# Altium PCB PCB.PcbDoc
Units mm, origin at the board's own origin, x right, y up, seen from the top; angles counter-clockwise.
Board outline 31.75 x 20.95 mm, 2 copper layers (Top Layer, Bottom Layer); 69 components, 37 nets, 155 pads, 28 vias.
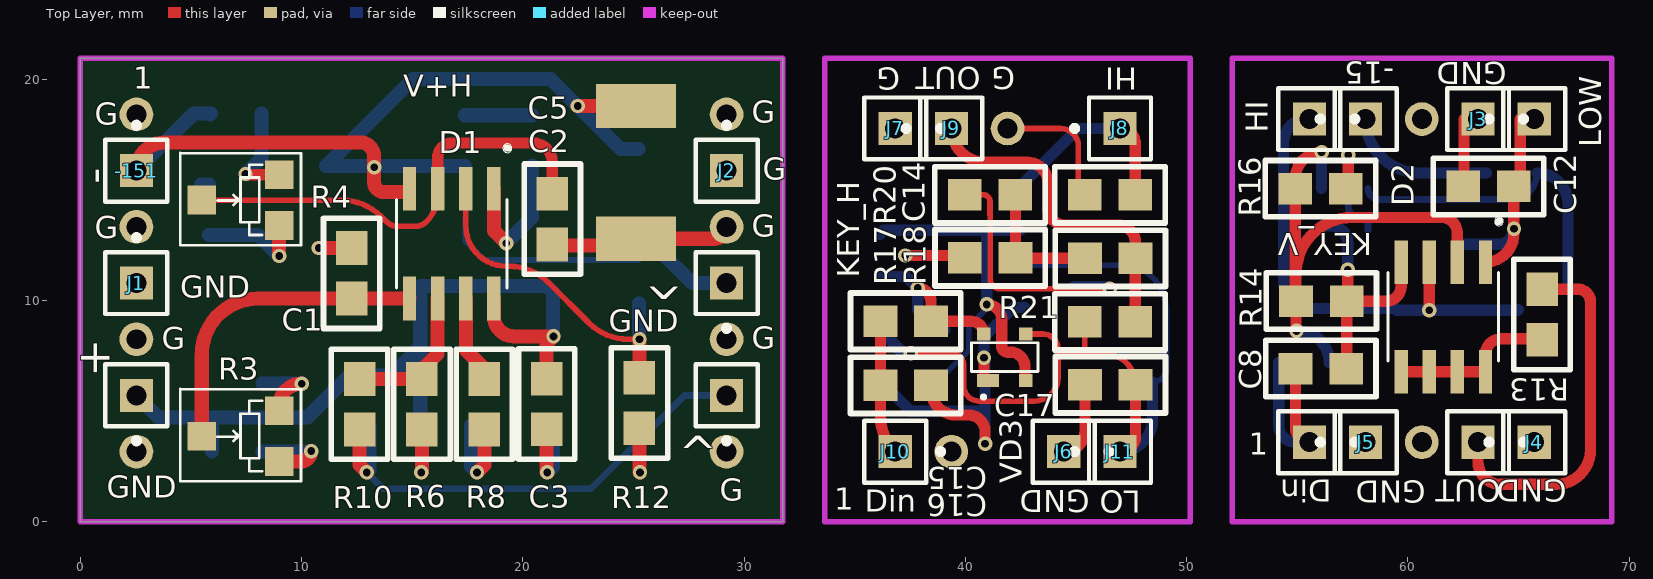
[diagram p0: Top Layer view]
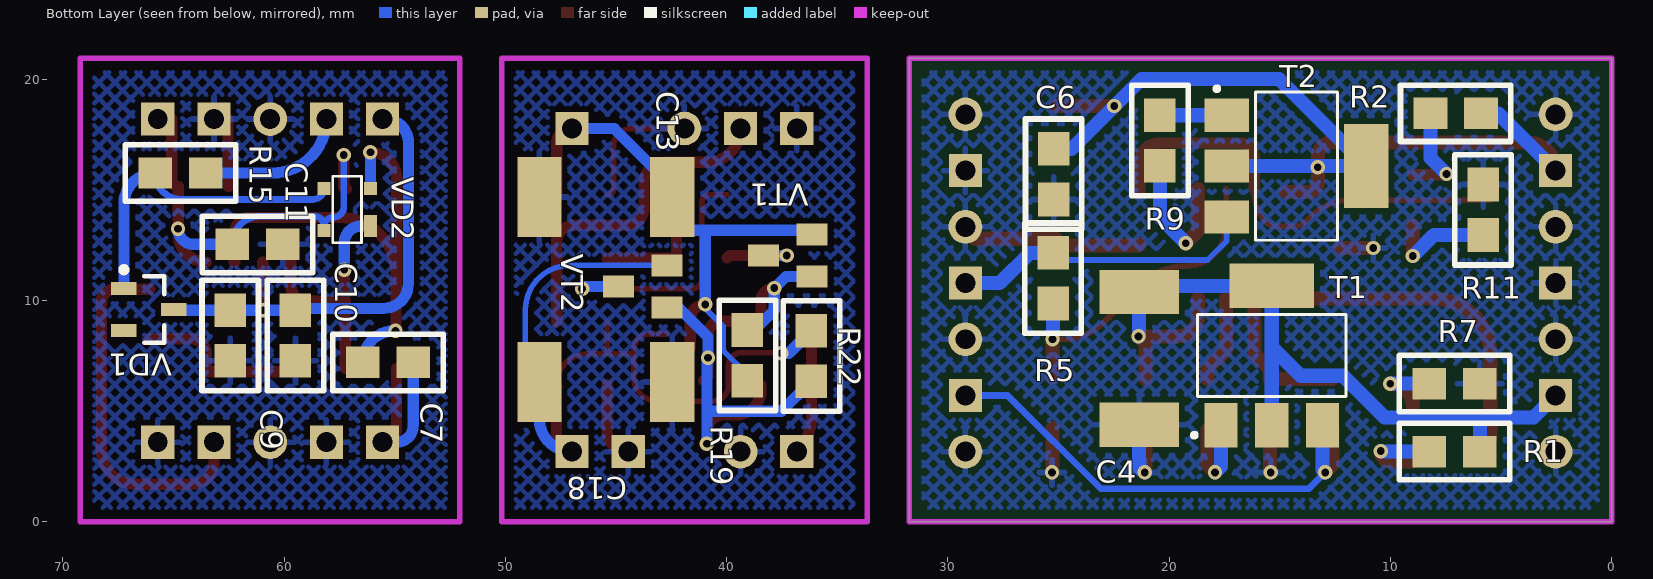
[diagram p1: Bottom Layer view, seen from below]

## Layer stack, top to bottom
Top Solder: solder mask 0.0102, Solder Resist, Dk 3.5
Top Layer: signal copper 0.0356
Dielectric 1: dielectric 0.32, FR-4, Dk 4.8
Bottom Layer: signal copper 0.0356
Bottom Solder: solder mask 0.0102, Solder Resist, Dk 3.5

## Board outline
0,0 0,20.955 31.75,20.955 31.75,0

## Design rules (kind name [scope] priority, off if disabled: settings)
Clearance [All] p1: gap=0.254
PolygonConnect [All] p1: connectstyle=Relief reliefconductorwidth=0.254 reliefentries=4 polygonreliefangle="90 Angle" airgapwidth=0.254
RoutingVias [All] p1: holewidth=0.711 width=1.27 viastyle="Through Hole" minholewidth=0.711 minwidth=1.27 maxholewidth=0.711 maxwidth=1.27
SolderMaskExpansion [All] p1: expansion=0.102
Width [All] p1: maxlimit=1 minlimit=0.127 preferedwidth=0.254
29 further rules are at their usual default settings.

## Classes and differential pairs
component class Sheet1: + -151 ^ C1 C2 C3 C4 C5 C6 D1 J1 J2 R2 R3 R4 R5 R6 R7 R8 R9 R10 R11 R12 T1 T2
component class Sheet2: C13 C14 C15 C16 C17 C18 J6 J7 J8 J9 J10 J11 R17 R18 R19 R21 R22 VD3 VT1 VT2

## Components (designator, comment, footprint, x,y, rotation, side; value= is the part's Value field where it differs from the comment)
+ "" PIN1 2.54,5.715 r180 top (schematic designator +15)
-15 "" PIN1 58.091,18.207 r90 top
-151 "-" PIN1 2.54,15.875 r0 top
^ "" PIN1 29.21,5.715 r180 top (schematic designator V_HIGH1)
^ "" PIN1 29.21,10.795 r180 top (schematic designator V_LOW1)
C1 "0.1" CAP_SMALL 10.998,13.741 r270 top
C2 "0.1" CAP_SMALL 22.606,11.176 r90 top
C3 "0.1" CAP_SMALL 22.352,2.819 r90 top
C4 "22" Cap_BIG 19.456,11.481 r0 bottom
C5 "22" Cap_BIG 27.026,19.888 r180 top
C6 "0.1" CAP_SMALL 23.952,13.208 r90 bottom
C7 "0.1" CAP_SMALL 57.811,5.938 r180 bottom
C8 "0.1" CAP_SMALL 58.573,8.199 r180 top
C9 "4.7" CAP_SMALL 61.164,5.913 r90 bottom
C10 "0.1" CAP_SMALL 58.218,5.913 r90 bottom
C11 "4.7" CAP_SMALL 58.7,13.812 r0 bottom
C12 "0.1" CAP_SMALL 61.139,13.889 r0 top
C13 "22,0" Cap_BIG 49.555,16.586 r270 bottom
C14 "0,1" CAP_SMALL 49.047,16.053 r180 top
C15 "100" CAP_SMALL 34.798,7.798 r0 top
C16 "100" CAP_SMALL 34.798,4.902 r0 top
C17 "0,1" CAP_SMALL 44.044,4.928 r0 top
C18 "22,0" Cap_BIG 49.555,8.23 r270 bottom
D1 "LF353" SOIC127P600X175-8N 16.789,12.573 r270 top
D2 "IRF7309" SOIC127P600X175-8N 61.601,9.266 r270 top
Din "" PIN1 55.551,3.602 r270 top
HI "" PIN1 55.551,18.207 r270 top (schematic designator V_HIGH)
J1 "GND" PIN1 2.54,10.795 r0 top
J2 "GND" PIN1 29.21,15.875 r0 top
J3 "GND1" PIN1 63.171,18.207 r270 top
J4 "GND1" PIN1 65.711,3.602 r90 top
J5 "GND1" PIN1 58.091,3.602 r90 top
J6 "GND" PIN1 44.45,3.175 r270 top
J7 "G" PIN1 36.83,17.78 r270 top
J8 "HI" PIN1 46.99,17.78 r90 top
J9 "OUT" PIN1 39.37,17.78 r90 top
J10 "Din" PIN1 36.83,3.175 r270 top
J11 "LO" PIN1 46.99,3.175 r90 top
LOW "" PIN1 65.711,18.207 r90 top (schematic designator V_LOW)
OUT "" PIN1 63.171,3.602 r270 top
R1 "10k" RES 4.623,1.93 r90 bottom
R2 "10k" RES 4.572,17.221 r90 bottom
R3 "10k" PODSR_RES 7.163,3.861 r90 top
R4 "10k" PODSR_RES 7.163,14.529 r90 top
R5 "249" RES 26.492,8.534 r180 bottom
R6 "1k" RES 14.199,2.834 r0 top
R7 "10k" RES 4.623,5.004 r90 bottom
R8 "100" RES 19.507,7.798 r180 top
R9 "100" RES 21.666,14.757 r180 bottom
R10 "249" RES 13.868,7.798 r180 top
R11 "10k" RES 4.572,16.586 r0 bottom
R12 "1k" RES 24.028,2.896 r0 top
R13 "3" RES 67.311,11.857 r180 top
R14 "100k" RES 58.573,8.732 r90 top
R15 "10k" RES 62.205,14.524 r90 bottom
R16 "10k" RES 53.569,16.302 r270 top
R17 "3" RES 38.641,13.183 r270 top
R18 "3" RES 44.069,13.157 r270 top
R19 "2,21" RES 37.821,10.008 r0 bottom
R20 "3" RES 38.633,16.027 r270 top
R21 "100k" RES 44.058,10.287 r270 top
R22 "2,21" RES 34.925,9.982 r0 bottom
T1 "PZT2222" SOT230P700X180-4N 15.367,7.518 r180 bottom
T2 "PZT2907" SOT230P700X180-4N 14.249,16.078 r270 bottom
VD1 "MMBZ5229" SOT-23_N 66.117,9.596 r180 bottom
VD2 "HSMS2805" SOT-143B 57.151,14.117 r90 bottom
VD3 "HSMS2805" SOT-143B 41.783,7.442 r0 top
VT1 "MMBT3640" SOT23-BEC_MMBT3640*(Primary) 37.236,12.04 r90 bottom
VT2 "MMBT2369" SOT23-BEC_MMBT3640*(Primary) 43.79,10.643 r90 bottom

## Footprints (in the part's own frame and the unit in brackets; to place one, negate y for a bottom-side part, rotate by r counter-clockwise, add the part's x,y. Pads: shape width x height; smd on the part's side, far side on the other; paste and mask are expansions set on the pad)
Cap_BIG [mm] "FROM_MAX"
  rect 3.6x2 smd: 1(1.905,7.092) 2(1.905,1.092)
  body extent 0,-0.01 3.81,8.19, height 2.54
CAP_SMALL [mil] "FROM_MAX"
  rect 60x55.98 smd: 1(53.71,50) 2(143.71,50)
  silkscreen extent 1,0 197,100, body extent 20,18 178,82, height 100
PIN1 [mm] "Connector; Plug"
  rect 1.5x1.5 hole 0.9: 1(0,0)
  silkscreen extent -1.4,-1.4 1.4,2.17
PODSR_RES [mm] "PODSR_RES"
  rect 1.3x1.3 smd: 1(-1.136,-1.83) 2(0.014,1.67) 3(1.164,-1.83)
  silkscreen extent -2.03,-2.82 2.14,2.64
RES [mil] "FROM_MAX"
  rect 55.98x60 smd: 1(49,52.71) 2(49,142.71)
  silkscreen extent -1,0 99,196, body extent 17,19 81,177, height 100
SOIC127P600X175-8N [mm]
  rect 1.97x0.6 smd: 1(-2.475,1.905) 2(-2.475,0.635) 3(-2.475,-0.635) 4(-2.475,-1.905) 5(2.475,-1.905) 6(2.475,-0.635) 7(2.475,0.635) 8(2.475,1.905)
  silkscreen extent -4.51,-2.5 2,2.71
SOT23-BEC_MMBT3640*(Primary) [mm]
  rect 1x1.4 smd: 1(-0.95,-1.1) 2(0.95,-1.1) 3(0,1.1)
SOT230P700X180-4N [mm]
  rect 1.5x2 smd: 1(-2.3,-3.15) 2(0,-3.15) 3(2.3,-3.15)
  rect 3.8x2 smd: 4(0,3.15)
  silkscreen extent -3.6,-3.7 3.35,1.85
SOT-23_N [mm] "SOT23, 3-Leads, Body 2.9x1.3mm, Pitch 0.95mm, Lead Span 2.5mm, IPC Medium Density"
  rect 1.15x0.6 smd: 1(-1.125,0.95) 2(-1.125,-0.95) 3(1.125,0)
  silkscreen extent -1.25,-1.5 0.7,1.92, body extent -0.7,-1.5 0.7,1.5, height 1.1
SOT-143B [mm]
  rect 1x0.6 smd: 1(-0.75,-1.05)
  rect 0.6x0.6 smd: 2(0.95,-1.05) 3(0.95,1.05) 4(-0.95,1.05)
  silkscreen extent -1.5,-0.65 1.5,0.65

## Part data
+ -15 -151 ^ ^ Din HI J1 J2 J3 J4 J5 J6 J7 J8 J9 J10 J11 LOW OUT: library part Socket, "Socket"
C1 C2 C3 C6 C7 C8 C9 C10 C11 C12 C14 C15 C16 C17: library part CAP_SMALL
C4 C5 C13 C18: library part CAP_BIG
R1 R2 R5 R6 R7 R8 R9 R10 R11 R12 R13 R14 R15 R16 R17 R18 R19 R20 R21 R22: library part RES
R3 R4: library part RES_PODSTR
T1: library part PZT2222A
T2: library part PZT2907A
VD1: library part "Diode BAS16", "Silicon Switching Diode for High-Speed Switching"
VD2 VD3: library part HSMS-2805

## Free pads (board coordinates)
  round 1.524 hole 0.9: 1(2.54,3.175) 1(2.54,8.255) 1(2.54,13.335) 1(2.54,18.415) 1(29.21,3.175) 1(29.21,8.255) 1(29.21,13.335) 1(29.21,18.415) 1(39.37,3.175) 1(41.91,17.78) 1(60.631,3.602) 1(60.631,18.207)

## Via types
v1: diameter 0.65, hole 0.35, Top Layer to Bottom Layer, 28 vias

## Nets (pads, with @x,y where several pads share a name; then routed paths per layer and width w, separated by ;. In a path a pad name is that pad's centre, name@x,y a point inside that pad or via, vN(x,y) a via of type N, cw(c..) or ccw(c..) an arc to the next point about the centre after c; other vN are vias at no path point)
+15: +.1 C3.2 C4.2 D1.8 R1.1 T1.2 T1.4 | length 36.9
  Top Layer w0.635: D1.8 18.694,9.293 ccw(c19.605,9.293) 19.605,8.382 v1(21.387,8.382) 21.082,8.077 C3.2
  Bottom Layer w0.635: +.1 3.531,4.724 5.994,4.724 5.962,4.692 R1.1 ; 5.715,4.724 10.262,4.724 12.141,6.604 14.072,6.604 15.367,7.899 ; T1.2 15.367,7.899 ; v1(21.387,8.382) 21.361,8.407 C4.2 21.082,10.668 T1.4 15.367,7.899
-15: -151.1 C5.2 C6.2 D1.4 R2.1 T2.2 T2.4 | length 45.2
  Top Layer w0.635: -151.1 cw(c3.81,15.875) 3.81,17.145 12.649,17.145 cw(c12.649,16.51) 13.284,16.51 v1(13.284,16.027) 13.284,15.342 ccw(c13.716,15.342) 13.716,14.91 D1.4@14.746,14.91 ; v1(22.479,18.796) C5.2
  Bottom Layer w0.635: -151.1 5.131,18.466 R2.1 R2.1@5.86,18.415 ; T2.2 T2.4 15.036,20.015 21.26,20.015 v1(22.479,18.796) 24.417,16.858 C6.2
GND: C1.1 C2.1 C3.1 C4.1 C5.1 C6.1 J1.1 J2.1 pad.1@2.54,3.175 pad.1@2.54,8.255 pad.1@2.54,13.335 pad.1@2.54,18.415 pad.1@29.21,3.175 pad.1@29.21,8.255 pad.1@29.21,13.335 pad.1@29.21,18.415 R6.1 R7.1 R11.1 R12.1 | length 18.4
  Top Layer w0.635: v1@10.77,12.37 v1(10.777,12.377) C1.1 ; v1(15.418,2.235) 15.443,2.261 R6.1 ; C3.1 21.082,2.261 v1(21.107,2.235) ; C2.1 21.379,12.497 25.121,12.497 C5.1@25.273,12.344 ; C5.1 28.671,12.796 ccw(c28.671,13.335) pad.1@29.21,13.335 ; R12.1 25.273,2.261 v1(25.298,2.235)
  Bottom Layer w0.635: R11.1@5.468,15.247 R11.1 ; v1(21.107,2.235) 21.361,2.489 C4.1
GND1: C9.1 C10.1 C11.1 C12.1 J3.1 J4.1 J5.1 pad.1@60.631,3.602 pad.1@60.631,18.207 | length 3.1
  Top Layer w0.508: C12.1 ccw(c62.503,15.191) 62.536,15.191 J3.1@62.536,18.207
GND2: C13.2 C14.2 C17.1 C18.1 J6.1 J7.1 pad.1@39.37,3.175 pad.1@41.91,17.78 | length 10.7
  Top Layer w0.254: pad.1@41.275,17.78 44.298,17.78 cw(c44.298,16.967) 45.11,16.967 45.11,15.07 ccw(c45.397,15.07) C14.2 cw(c45.397,15.095) C14.2@45.085,15.095
  Top Layer w0.508: J6.1 ccw(c44.45,4.133) 45.408,4.133 C17.1
Net-15_1: -15.1 R15.1 | length 6.8
  Bottom Layer w0.508: -15.1 ccw(c60.529,18.207) 60.529,15.768 R15.1
NetC1_2: C1.2 D1.5 R3.2 | length 14.5
  Top Layer w0.635: R3.2 5.493,7.551 cw(c8.033,7.551) 8.033,10.091 C1.2 14.878,10.091 D1.5
NetC2_2: C2.2 D1.3 R4.2 | length 21.1
  Top Layer w0.254: R4.2 11.812,14.543 cw(c11.812,12.003) 13.608,13.799 13.843,13.563 ccw(c14.334,14.054) 14.334,13.36 15.156,13.36 ccw(c15.156,14.054) 15.646,13.564 ccw(c14.42,14.79) 16.154,14.79 D1.3
  Top Layer w0.508: D1.3 16.154,16.459 cw(c16.815,16.459) 16.815,17.12 20.472,17.12 cw(c20.472,16.256) 21.336,16.256 C2.2
NetC7_1: C7.1 D2.2 R14.2 R16.1 VD2.2 | length 24.5
  Top Layer w0.508: v1@54.916,8.58 54.948,8.613 R14.2 ; v1@56.109,16.708 ccw(c56.109,15.507) 54.908,15.507 R16.1 54.908,10.017 ccw(c54.948,10.017) R14.2 ; D2.2@62.256,11.761 cw(c62.236,11.761) D2.2 62.231,11.741 62.231,13.076 ccw(c61.545,13.076) 61.545,13.762 57.488,13.762 ccw(c57.488,11.222) 54.948,11.222 R14.2
  Bottom Layer w0.508: v1(54.966,8.631) 55.025,8.631 cw(c55.025,7.208) C7.1 ; v1@56.084,16.708 v1(56.101,16.708) VD2.2
NetC7_2: C7.2 C8.2 Din.1 | length 8.4
  Top Layer w0.508: C8.2@54.916,6.929 C8.2 54.923,4.229 ccw(c55.551,4.229) Din.1
  Bottom Layer w0.508: C7.2 54.161,4.356 ccw(c54.916,4.356) 54.916,3.602 Din.1
NetC8_1: C8.1 D2.4 R14.1 VD2.1 | length 11.3
  Top Layer w0.508: C8.1 ccw(c57.209,6.954) 57.234,6.954 R14.1 ; v1(57.278,11.399) 57.278,10.02 cw(c57.234,10.02) R14.1 ; D2.4@59.691,11.741 D2.4 59.696,10.637 59.691,10.637 cw(c59.03,10.637) 59.03,9.977 R14.1
  Bottom Layer w0.508: VD2.1 56.529,13.367 cw(c56.529,12.619) 57.278,12.619 v1(57.278,11.399)
NetC9_2: C9.2 C10.2 D2.3 HI.1 VD1.3 | length 21.6
  Top Layer w0.508: v1(60.966,9.571) D2.3
  Bottom Layer w0.508: HI.1 55.449,18.207 ccw(c55.449,17.14) 54.382,17.14 54.382,10.79 ccw(c55.525,10.79) 55.525,9.647 59.404,9.647 cw(c59.404,9.563) C10.2 C9.2 64.959,9.563 ccw(c64.959,9.596) VD1.3
NetC11_2: C11.2 C12.2 D2.1 LOW.1 R16.2 VD2.4 | length 20.9
  Top Layer w0.508: R16.2 ccw(c57.194,15.166) 57.303,15.166 v1(57.303,16.581) ; D2.1 ccw(c63.506,13.024) 64.789,13.024 C12.2 ccw(c64.789,15.445) 65.076,15.445 LOW.1@65.076,18.207
  Bottom Layer w0.305: v1(57.303,16.581) 57.303,14.244 ccw(c57.786,14.244) 57.786,13.762 cw(c57.786,13.347) VD2.4@58.201,13.347 ; VD2.4 VD2.4@58.201,13.347 ; C11.2 ccw(c61.08,12.542) 61.08,13.812 58.624,13.812 ccw(c58.624,13.389) 58.201,13.389 VD2.4@58.201,13.347
  Bottom Layer w0.508: C11.2 64.085,12.542 ccw(c64.085,13.254) v1(64.796,13.254)
NetC13_1: C13.1 C14.1 J8.1 R19.2 VD3.2 VT1.2 | length 27.2
  Top Layer w0.508: v1(40.97,9.83) cw(c40.97,9.159) 41.641,9.159 41.641,7.94 ccw(c41.91,7.94) 41.91,7.671 42.037,7.671 cw(c42.037,7.01) 42.697,7.01 42.697,6.428 ccw(c42.733,6.428) VD3.2 ; J8.1 cw(c46.99,17.087) 47.683,17.087 C14.1
  Bottom Layer w0.127: v1@40.963,9.822 v1(40.97,9.83)
  Bottom Layer w0.254: R19.2 39.065,6.655 40.137,7.727 40.137,7.729 40.157,7.749 40.157,8.839 v1@40.996,9.677
  Bottom Layer w0.508: VT1.2 36.329,13.183 40.894,13.183 ; v1(40.97,9.83) 40.97,13.106 40.894,13.183 ; C13.1 42.463,15.158 45.085,17.78 J8.1@46.355,17.78 ; C13.1@42.469,13.183 40.894,13.183
NetC15_1: C15.1 C16.1 J10.1 | length 6.2
  Top Layer w0.508: C15.1@36.061,8.966 C15.1 C16.1 36.162,4.787 ccw(c38.442,4.787) J10.1
NetC15_2: C15.2 R19.1 VD3.4 VT1.1 | length 9.1
  Top Layer w0.508: v1(37.846,10.566) cw(c37.846,9.964) 38.448,9.964 C15.2 40.257,9.068 cw(c40.257,8.492) VD3.4
  Bottom Layer w0.508: VT1.1 37.323,11.09 v1(37.846,10.566) 37.846,9.576 38.753,8.669 R19.1
NetC16_2: C16.2 R22.2 VD3.1 VT2.1 | length 17.9
  Top Layer w0.508: C16.2 38.448,5.976 ccw(c39.599,5.976) 39.599,4.826 40.157,4.826 cw(c40.157,4.089) 40.894,4.089 v1(40.894,3.531) ; v1(40.843,7.417) 40.843,6.582 VD3.1
  Bottom Layer w0.508: R22.2 37.523,5.004 40.894,5.004 ; v1(40.894,3.531) 40.894,5.004 ; VT2.1 42.179,9.693 40.843,8.357 v1(40.843,7.417) 40.894,7.366 40.894,5.004
NetC17_2: C17.2 C18.2 J11.1 R21.1 R22.1 VD3.3 VT2.2 | length 38.2
  Top Layer w0.254: v1(37.541,7.62) cw(c37.567,7.62) 37.567,7.645 39.345,7.645 cw(c39.345,7.061) 39.929,7.061 39.929,6.147 ccw(c40.615,6.147) 40.615,5.461 43.129,5.461 ccw(c43.129,6.528) 44.196,6.528 44.196,7.595 ; VD3.3 43.502,8.492 cw(c43.502,7.798) 44.196,7.811 ; R21.1 45.397,7.638 ccw(c45.441,7.638) 45.441,7.595 ; C17.2 ccw(c46.297,6.198) 46.297,7.595 45.441,7.595 ; 44.196,7.595 44.196,7.798 ; 44.196,7.595 45.441,7.595 ; 44.196,7.798 ccw(c43.502,7.798) 44.196,7.811 ; 44.196,7.798 44.196,7.811
  Top Layer w0.508: J11.1 ccw(c46.99,3.879) 47.694,3.879 C17.2 ; C17.2@47.668,6.096 C17.2@47.683,6.111
  Bottom Layer w0.254: VT2.2 47.085,11.593 cw(c47.085,9.579) 49.098,9.579 49.098,6.96 cw(c48.463,6.96) C18.2
  Bottom Layer w0.508: R22.1 37.193,7.62 v1(37.541,7.62) ; J11.1 ccw(c46.99,4.648) 48.463,4.648 C18.2
NetD1_1: D1.1 R9.1 | length 6.7
  Top Layer w0.635: D1.1 18.694,13.157 v1(19.253,12.598)
  Bottom Layer w0.635: v1(19.253,12.598) 20.422,13.767 R9.1
NetD1_2: D1.2 R5.1 R12.2 | length 15
  Top Layer w0.254: D1.2 17.424,13.386 ccw(c19.253,13.386) 19.253,11.557 19.369,11.557 cw(c19.369,9.017) 21.166,10.813 22.98,8.999 ccw(c24.776,10.795) 24.776,8.255 v1(25.273,8.255)
  Top Layer w0.635: R12.2 v1(25.273,8.255)
  Bottom Layer w0.635: v1@25.248,8.28 R5.1
NetD1_6: D1.6 R6.2 R10.1 | length 6.8
  Top Layer w0.635: R10.1 15.428,6.459 15.443,6.444 15.443,6.883 16.154,7.595 D1.6
NetD1_7: D1.7 R8.1 | length 4
  Top Layer w0.635: D1.7 17.424,7.772 18.263,6.934 R8.1
NetD2_5: D2.5 D2.6 D2.7 D2.8 R13.2 | length 7.6
  Top Layer w0.508: D2.5 D2.6 D2.7 D2.8 63.506,7.569 cw(c64.212,7.569) 64.212,8.275 66.023,8.275 cw(c66.023,8.232) R13.2
NetJ9_1: J9.1 R18.2 R21.2 | length 15.3
  Top Layer w0.508: J9.1 ccw(c40.894,17.78) 40.894,16.256 42.799,16.256 cw(c42.799,15.316) 43.739,15.316 43.739,14.173 ccw(c44.501,14.173) 44.501,13.411 46.888,13.411 cw(c46.888,12.606) 47.694,12.606 R18.2 47.683,11.902 R21.2
NetOUT_1: OUT.1 R13.1 | length 16.6
  Top Layer w0.508: OUT.1 63.171,2.713 ccw(c64.187,2.713) 64.187,1.697 66.701,1.697 ccw(c66.701,3.246) 68.251,3.246 68.251,9.952 ccw(c67.684,9.952) 67.684,10.518 R13.1
NetR1_2: R1.2 R3.1 | length 3.9
  Top Layer w0.635: R3.1 9.964,2.725 ccw(c9.964,3.2) v1(10.439,3.2)
  Bottom Layer w0.635: R1.2 10.414,3.175 v1(10.439,3.2)
NetR2_2: R2.2 R4.3 | length 4.6
  Top Layer w0.508: v1(7.468,15.723) 7.498,15.693 R4.3
  Bottom Layer w0.635: v1(7.468,15.723) 8.197,16.452 R2.2
NetR3_3: R3.3 R7.2 | length 3.6
  Top Layer w0.635: R3.3 8.993,5.234 cw(c10.008,5.234) v1(10.008,6.248)
  Bottom Layer w0.635: R7.2 v1(10.008,6.248)
NetR4_1: R4.1 R11.2 | length 4.9
  Top Layer w0.635: v1(8.992,12.014) 8.993,12.016 R4.1
  Bottom Layer w0.635: R11.2 8.044,12.961 v1(8.992,12.014)
NetR5_2: ^.1@29.21,10.795 R5.2 T2.3 | length 13.8
  Bottom Layer w0.254: T2.3 17.399,12.7 18.263,11.836 R5.2@25.248,11.836
  Bottom Layer w0.635: R5.2 26.296,12.159 27.661,10.795 ^.1@29.21,10.795
NetR8_2: R8.2 T1.1 | length 4.3
  Top Layer w0.635: v1(17.932,2.235) 18.263,2.565 R8.2
  Bottom Layer w0.635: T1.1 17.667,2.501 v1(17.932,2.235)
NetR9_2: R9.2 T2.1 | length 3
  Bottom Layer w0.635: T2.1 20.418,18.378 R9.2
NetR10_2: ^.1@29.21,5.715 R10.2 T1.3 | length 22.6
  Top Layer w0.635: R10.2 12.624,2.565 v1(12.954,2.235)
  Bottom Layer w0.305: v1(12.954,2.235) 13.685,1.504 23.094,1.504 27.305,5.715 ^.1@29.21,5.715
  Bottom Layer w0.635: v1(12.954,2.235) 13.067,2.348 T1.3
NetR15_2: R15.2 VD1.1 VD2.3 | length 14.6
  Bottom Layer w0.305: VD2.3 ccw(c58.694,15.067) 58.694,14.574 64.636,14.574 ccw(c64.636,15.768) R15.2
  Bottom Layer w0.508: R15.2 cw(c65.83,14.356) 67.242,14.356 VD1.1
NetR17_1: R17.1 VT1.3 | length 3.8
  Top Layer w0.508: v1(37.287,12.04) 39.878,12.04 R17.1
  Bottom Layer w0.508: v1(37.287,12.04) VT1.3
NetR17_2: R17.2 R18.1 R20.2 | length 6
  Top Layer w0.508: R20.2@42.266,14.775 R17.2 42.291,11.913 R18.1
NetR20_1: R20.1 VT2.3 | length 12.1
  Top Layer w0.254: R20.1 40.81,14.783 cw(c40.81,14.478) 41.115,14.478 41.115,13.868 41.123,13.868 41.123,10.973 ccw(c41.554,10.973) 41.554,10.541 ; 41.605,10.541 v1(46.533,10.541)
  Bottom Layer w0.508: VT2.3 46.38,10.643 v1(46.533,10.541)
pads on no net: VD1.2

## Polygon pours and split planes (outlines as drawn)
GND on Bottom Layer "Top Layer-No Net" (hatched 45Degree grid 0.508 track 0.203, remove dead copper, pour order 14): 0.635,20.32 0.635,0.635 31.115,0.635 31.115,20.32 0.635,20.32
GND2 on Bottom Layer "Top Layer-No Net" (hatched 45Degree grid 0.508 track 0.203, remove dead copper, pour order 26): 34.29,20.32 34.29,0.635 49.53,0.635 49.53,20.32
GND1 on Bottom Layer "Top Layer-No Net" (hatched 45Degree grid 0.508 track 0.203, remove dead copper, pour order 28): 52.705,20.32 52.705,0.635 68.58,0.635 68.58,20.32

## Keep-outs
Keep-Out Layer:
  lines w0.254: 0,0 31.75,0 31.75,20.955 0,20.955 0,0 ; 33.655,0 33.655,20.955 50.165,20.955 50.165,0 33.655,0 ; 52.07,0 69.215,0 69.215,20.955 52.07,20.955 52.07,0

## Silkscreen, mask and mechanical layers (free items; w line width, h text height)
Top Overlay:
  circle w0.254: c40.818,5.639 r0.036
  circle w0.254: c64.11,13.584 r0.036
  circle w0.254: c19.304,16.891 r0.036
  text "GND" at 64.465,20.777 h1 r180
  text "G" at 42.266,20.549 h1 r180
  text "1" at 2.388,19.583 h1
  text "V+H" at 14.605,19.202 h1
  text "G" at 30.353,18.034 h1
  text "G" at 0.66,17.958 h1
  text "G" at 30.836,15.469 h1
  text "KEY_V" at 58.395,13.05 h1 r180
  text "G" at 30.353,12.878 h1
  text "G" at 0.66,12.827 h1
  text "KEY_H" at 35.204,11.024 h1 r90
  text "GND" at 23.876,8.585 h1
  text "G" at 30.353,7.823 h1
  text "G" at 3.683,7.798 h1
  text "1" at 52.807,3.043 h1
  text "GND" at 67.184,1.9 h1 r180
  text "GND" at 60.808,1.849 h1 r180
  text "GND" at 1.194,1.092 h1
  text "G" at 28.905,0.965 h1
  text "1" at 34.087,0.552 h1